# Altium PCB ePBR25_ACU_Controller_rev0.PcbDoc (part 1 of 2)
Units mil, origin at the board's own origin, x right, y up, seen from the top; angles counter-clockwise.
Board outline 3048 x 1903 mil, 2 copper layers (Top Layer, Bottom Layer); 150 components, 106 nets, 515 pads, 139 vias.
Unrouted connection lines stored in the file: 127.
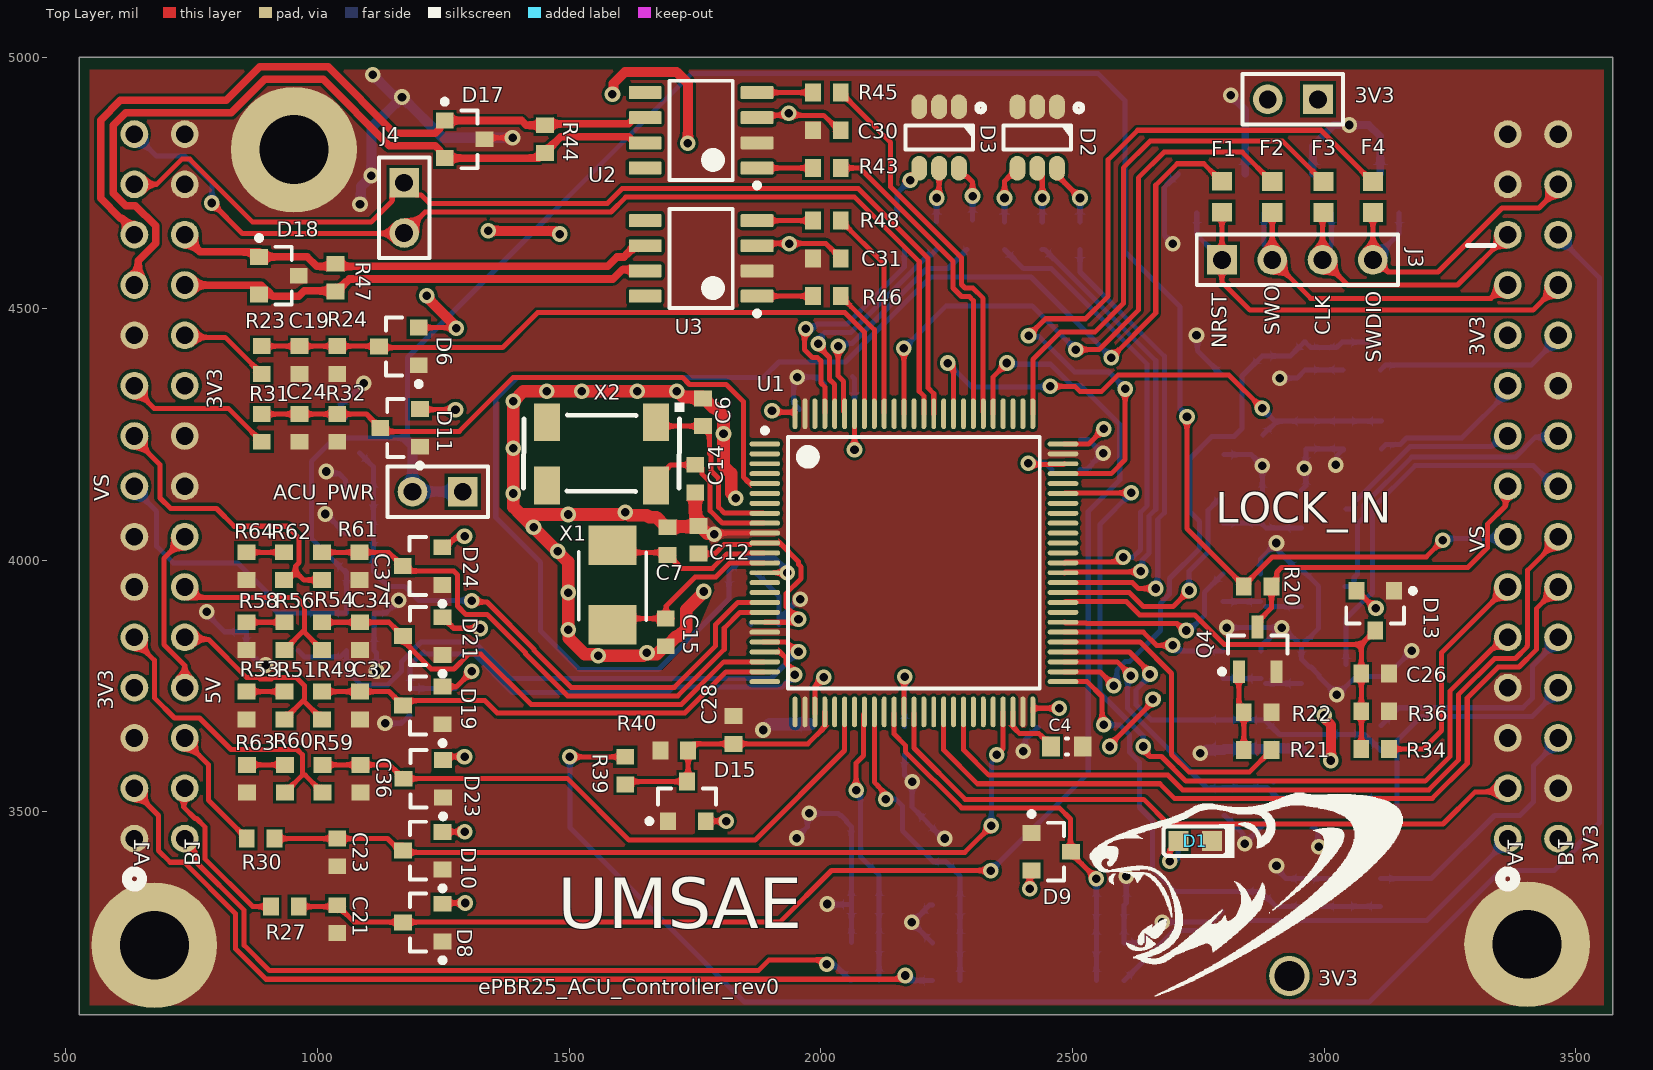
[diagram p0: Top Layer view]
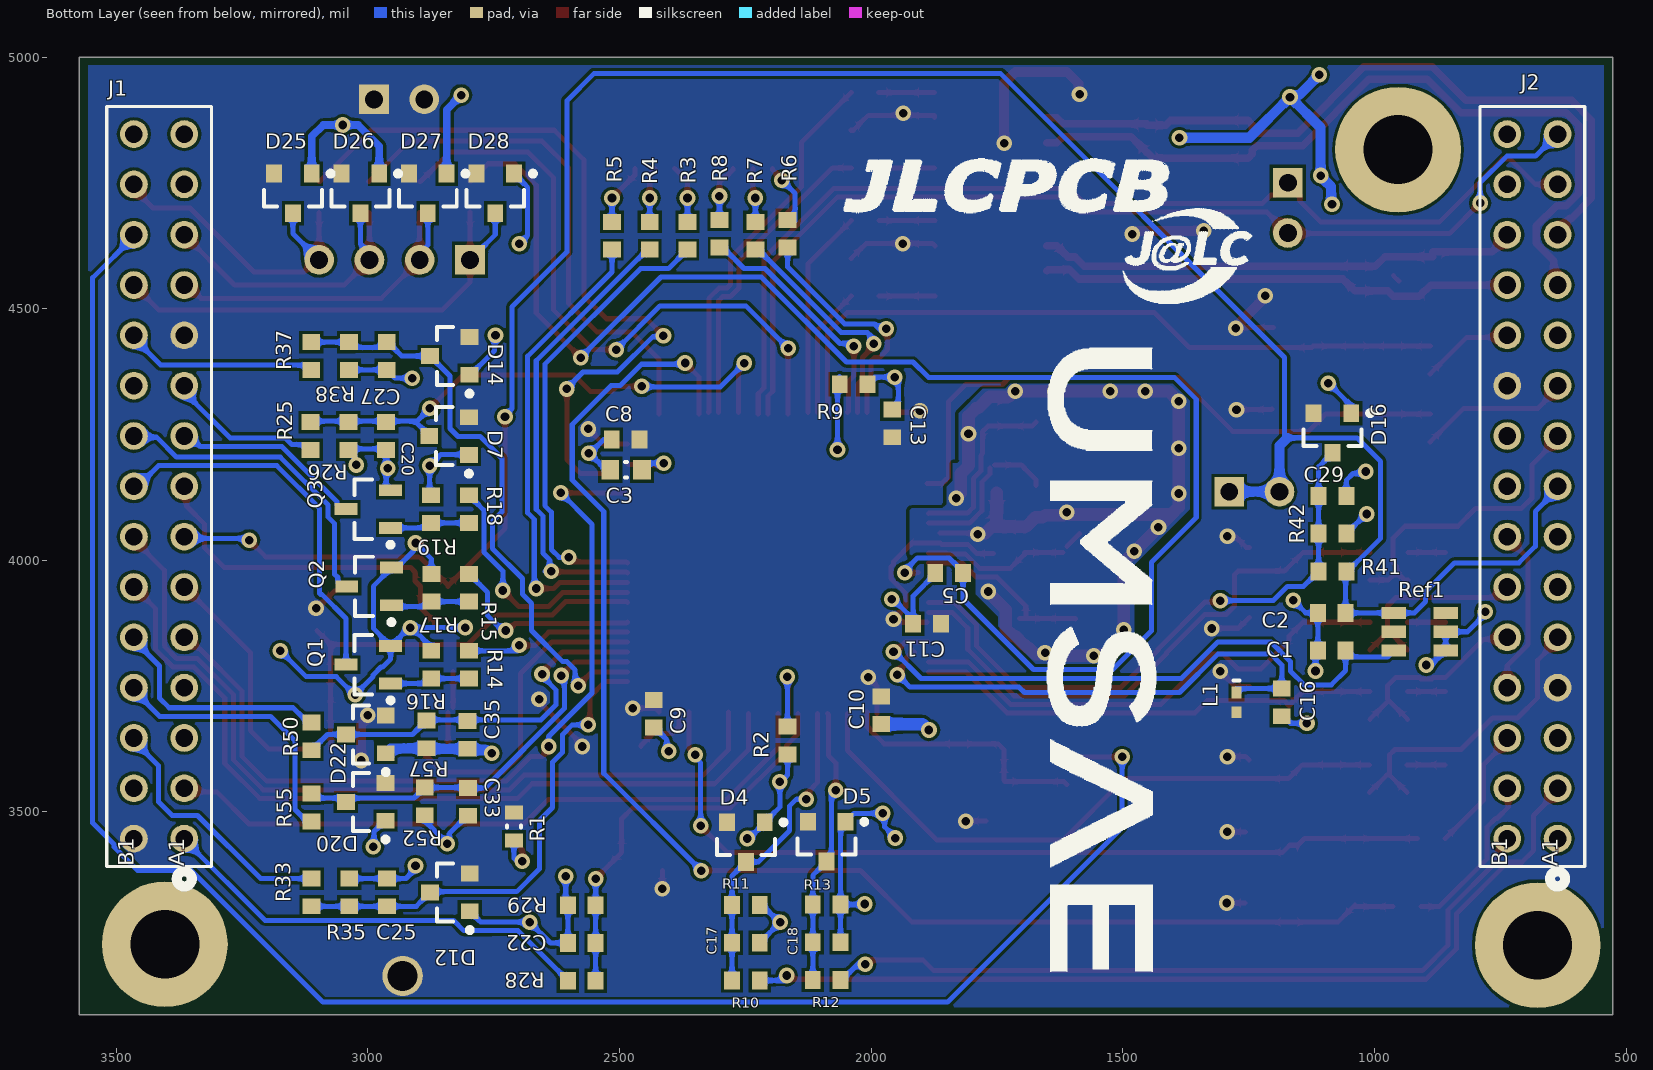
[diagram p1: Bottom Layer view, seen from below]

## Layer stack, top to bottom
Top Solder: solder mask 0.4, Solder Resist, Dk 3.5
Top Layer: signal copper 1.4
Dielectric 1: dielectric 12.6, FR-4, Dk 4.8
Bottom Layer: signal copper 1.4
Bottom Solder: solder mask 0.4, Solder Resist, Dk 3.5

## Board outline
526,3097 3574,3097 3574,5000 526,5000

## Design rules (kind name [scope] priority, off if disabled: settings)
Clearance [All] p1: gap=6 ignorepadtopadclearanceinfootprint=FALSE except(0: Arc-Hole Track-Hole SMDPad-Hole THPad-Hole Via-Hole Fill-Hole Poly-Hole Region-Hole Text-Hole)
DiffPairsRouting [All] p1: maxlimit=10 minlimit=10 mostfreqgap=10 toplayer_minwidth=15 toplayer_maxwidth=15 toplayer_prefwidth=15 bottomlayer_minwidth=15 bottomlayer_maxwidth=15 bottomlayer_prefwidth=15 maxuncoupledlength=500
HoleSize [All] p1: absolutevalues=TRUE maxlimit=200 minlimit=15 maxpercent=80.000 minpercent=20.000
HoleToHoleClearance [All] p1: gap=19.68 allowstackedmicrovias=TRUE
MinimumAnnularRing MinimumAnnularRing_Pad [IsPad] p1: minimumring=7
MinimumAnnularRing MinimumAnnularRing_Via [IsVia] p2: minimumring=5
MinimumSolderMaskSliver [All] p1: minsoldermaskwidth=3.86
PlaneClearance [All] p1: clearance=15
PlaneConnect PlaneConnect_12V [InNet('12V')] p1: planeconnectstyle=Direct reliefexpansion=20 reliefentries=4 reliefconductorwidth=20 reliefairgap=10
PlaneConnect PlaneConnect_1 [All] p2: planeconnectstyle=Relief reliefexpansion=15 reliefentries=4 reliefconductorwidth=15 reliefairgap=10
PolygonConnect [All] p1: connectstyle=Direct reliefconductorwidth=15 reliefentries=4 polygonreliefangle="90 Angle" airgapwidth=10
RoutingVias [All] p1: holewidth=17 width=31 viastyle="Through Hole" minholewidth=15 minwidth=29 maxholewidth=50 maxwidth=100
SilkToSilkClearance [All] p1: silktosilkclearance=1.97
SilkToSolderMaskClearance [IsPad] p1: minsilkscreentomaskgap=5.91 clearancetoexposedcopper=TRUE
SolderMaskExpansion [All] p1: expansion=3 istentingtop=FALSE
SupplyNets "Schematic Supply Nets_4" [InNet('3V3')] p1: voltage=0.000
SupplyNets "Schematic Supply Nets_3" [InNet('GND')] p2: voltage=0.000
SupplyNets "Schematic Supply Nets_2" [InNet('3V3Ref')] p3: voltage=0.000
SupplyNets "Schematic Supply Nets_1" [InNet('ACU_PWR')] p4: voltage=0.000
SupplyNets "Schematic Supply Nets" [InNet('5V')] p5: voltage=0.000
Width [All] p1: maxlimit=200 minlimit=7 preferedwidth=15
22 further rules are at their usual default settings.

## Classes and differential pairs
component class "7  - Microcontroller": 3V3 ACU_PWR D1 J1 J2 J? R1
component class Designator: C19 D6 Q1 Q2 Q3 Q4 R14 R15 R16 R17 R18 R19 R20 R21 R22 R23 R24
differential pair CAN_SENS: +CAN_SENS_P -CAN_SENS_N
differential pair CAN: +CAN_P -CAN_N

## Components (designator, comment, footprint, x,y, rotation, side; value= is the part's Value field where it differs from the comment)
3V3 "" HDR1X2 2988,4916 r180 top (schematic designator J5)
ACU_PWR "" HDR1X2 1288.56,4136.34 r180 top (schematic designator J6)
C1 "Cap" 1608[0603] 1084.83,3820.5 r180 bottom value=1uF
C2 "Cap" 1608[0603] 1084.83,3895.5 r180 bottom value=100nF
C3 "2.2uF" CAPC0603(1608)100_N 2487,4180 r180 bottom value=100nF
C4 "100nF" CAPC0603(1608)100_N 2489,3630 r180 top
C5 "Cap" 1608[0603] 1845,3975 r180 bottom value=100nF
C6 "Cap" 1608[0603] 1766,4294.21 r90 top value=100pF
C7 "Cap" 1608[0603] 1695,4038 r270 top value=100pF
C8 "Cap" 1608[0603] 2488,4240 r180 bottom value=10nF
C9 "Cap" 1608[0603] 2432,3695 r90 bottom value=10nF
C10 "Cap" 1608[0603] 1980,3702 r90 bottom value=10nF
C11 "Cap" 1608[0603] 1889,3874 r180 bottom value=10nF
C12 "Cap" 1608[0603] 1757,4040.74 r270 top value=10nF
C13 "Cap" 1608[0603] 1958,4272 r270 bottom value=10nF
C14 "Cap" 1608[0603] 1750.37,4162.2 r90 top value=100pF
C15 "Cap" 1608[0603] 1691.75,3856.77 r90 top value=100pF
C16 "Cap" 1608[0603] 1184,3717.68 r90 bottom value=100nF
C17 "Cap" 1608[0603] 2249,3240 r0 bottom value=0.47uF
C18 "Cap" 1608[0603] 2088.44,3241 r0 bottom value=0.47uF
C19 "Cap" 1608[0603] 964,4398 r90 top value=100nF
C20 "Cap" 1608[0603] 2963.8,4247 r90 bottom value=0.47uF
C21 "Cap" 1608[0603] 1039,3287 r90 top value=0.47uF
C22 "Cap" 1608[0603] 2575,3239.63 r180 bottom value=0.47uF
C23 "Cap" 1608[0603] 1039,3419.65 r90 top value=0.47uF
C24 "Cap" 1608[0603] 964,4263 r90 top value=0.47uF
C25 "Cap" 1608[0603] 2962,3340 r270 bottom value=100nF
C26 "Cap" 1608[0603] 3101.56,3775 r180 top value=100nF
C27 "Cap" 1608[0603] 2962.59,4406 r90 bottom value=100nF
C28 "Cap" 1608[0603] 1826.38,3662.78 r270 top value=100nF
C29 "Cap" 1608[0603] 1083.29,4128 r0 bottom value=100nF
C30 "Cap" 1608[0603] 2012,4854.56 r0 top value=100nF
C31 "Cap" 1608[0603] 2012,4600 r0 top value=100nF
C32 "Cap" 1608[0603] 1084,3711.56 r90 top value=0.47uF
C33 "Cap" 1608[0603] 2801.06,3520 r90 bottom value=100nF
C34 "Cap" 1608[0603] 1084,3849.33 r90 top value=0.47uF
C35 "Cap" 1608[0603] 2802,3653 r90 bottom value=100nF
C36 "Cap" 1608[0603] 1085,3566 r90 top value=0.47uF
C37 "Cap" 1608[0603] 1083.48,3988.4 r90 top value=0.47uF
D1 "TLSU1008A(T04)" TOSH-0603LED_RED_V 2744,3442 r180 top
D2 "" CLX6C-FKB 2430,4840 r270 top
D3 "" CLX6C-FKB 2235,4840.05 r270 top
D4 "SZNUP1301ML3T1G" ONSC-SOT-23-3-318-08_V 2249,3440 r270 bottom
D5 "SZNUP1301ML3T1G" ONSC-SOT-23-3-318-08_V 2088.44,3441 r270 bottom
D6 "SZNUP1301ML3T1G" ONSC-SOT-23-3-318-08_V 1161.56,4425 r180 top
D7 "SZNUP1301ML3T1G" ONSC-SOT-23-3-318-08_V 2838.8,4247 r0 bottom
D8 "SZNUP1301ML3T1G" ONSC-SOT-23-3-318-08_V 1209,3280 r180 top
D9 "SZNUP1301ML3T1G" ONSC-SOT-23-3-318-08_V 2458,3421 r0 top
D10 "SZNUP1301ML3T1G" ONSC-SOT-23-3-318-08_V 1209,3423 r180 top
D11 "SZNUP1301ML3T1G" ONSC-SOT-23-3-318-08_V 1164,4263 r180 top
D12 "SZNUP1301ML3T1G" ONSC-SOT-23-3-318-08_V 2837,3340 r0 bottom
D13 "SZNUP1301ML3T1G" ONSC-SOT-23-3-318-08_V 3101.56,3900 r270 top
D14 "SZNUP1301ML3T1G" ONSC-SOT-23-3-318-08_V 2837.59,4406 r0 bottom
D15 "SZNUP1301ML3T1G" ONSC-SOT-23-3-318-08_V 1734,3521 r90 top
D16 "SZNUP1301ML3T1G" ONSC-SOT-23-3-318-08_V 1083.29,4253 r270 bottom
D17 "NUP2105LT1" ONSC-SOT-23-3-318-08_V 1292,4836.56 r0 top
D18 "NUP2105LT1" ONSC-SOT-23-3-318-08_V 923,4565.6 r0 top
D19 "SZNUP1301ML3T1G" ONSC-SOT-23-3-318-08_V 1209,3711.56 r180 top
D20 "SZNUP1301ML3T1G" ONSC-SOT-23-3-318-08_V 3004.42,3520 r0 bottom
D21 "SZNUP1301ML3T1G" ONSC-SOT-23-3-318-08_V 1209,3849.33 r180 top
D22 "SZNUP1301ML3T1G" ONSC-SOT-23-3-318-08_V 3004,3654 r0 bottom
D23 "SZNUP1301ML3T1G" ONSC-SOT-23-3-318-08_V 1210,3566 r180 top
D24 "SZNUP1301ML3T1G" ONSC-SOT-23-3-318-08_V 1208.48,3988.4 r180 top
D25 "SZNUP1301ML3T1G" ONSC-SOT-23-3-318-08_V 3149,4729 r270 bottom
D26 "SZNUP1301ML3T1G" ONSC-SOT-23-3-318-08_V 3015,4729 r270 bottom
D27 "SZNUP1301ML3T1G" ONSC-SOT-23-3-318-08_V 2881,4729 r270 bottom
D28 "SZNUP1301ML3T1G" ONSC-SOT-23-3-318-08_V 2747,4729 r270 bottom
F1 "PTC 80 mA" FUSC1608X100N 2797,4722.48 r270 top
F2 "PTC 80 mA" FUSC1608X100N 2897,4722 r270 top
F3 "PTC 80 mA" FUSC1608X100N 2999,4722.13 r270 top
F4 "PTC 80 mA" FUSC1608X100N 3097,4721.87 r270 top
J1 "6-534998-3" 6-534998-5_6-534998-5(Primary) 3465,4147 r90 bottom
J2 "6-534998-3" 6-534998-5_6-534998-5(Primary) 736,4147 r90 bottom
J3 "Header 4" HDR1X4 2797,4597 r0 top
J4 "" HDR1X2 1172,4750.41 r270 top
L1 "Inductor" 0402-A 1274,3717.68 r270 bottom value=10mH
Q1 "" SOT-23_N 2999.29,3792.62 r0 bottom
Q2 "" SOT-23_N 2997.7,3948 r0 bottom
Q3 "" SOT-23_N 2999.48,4101.84 r0 bottom
Q4 "" SOT-23_N 2868,3823 r90 top
R1 "560" RESC0603(1608)_L 2709.82,3471 r270 bottom
R2 "Res1" 1608[0603] 2166,3642 r270 bottom value=10K
R3 "Res1" 1608[0603] 2365,4645 r90 bottom value=130
R4 "Res1" 1608[0603] 2440,4645 r90 bottom value=36
R5 "Res1" 1608[0603] 2515,4645 r90 bottom value=36
R6 "Res1" 1608[0603] 2166,4648.87 r90 bottom value=130
R7 "Res1" 1608[0603] 2230,4645 r90 bottom value=36
R8 "Res1" 1608[0603] 2301.45,4648.87 r90 bottom value=36
R9 "Res1" 1608[0603] 2035,4350 r180 bottom value=10K
R10 "Res1" 1608[0603] 2249,3165 r180 bottom value="1.8k 0.1%"
R11 "Res1" 1608[0603] 2249,3315 r0 bottom value="3.3k 0.1%"
R12 "Res1" 1608[0603] 2088.44,3166 r180 bottom value="1.8k 0.1%"
R13 "Res1" 1608[0603] 2088.44,3316 r0 bottom value="3.3k 0.1%"
R14 "120" 1608[0603] 2799.29,3792.62 r270 bottom value=1K
R15 "120" 1608[0603] 2798.95,3945.47 r270 bottom value=1K
R16 "10K" 1608[0603] 2874.29,3792.62 r270 bottom value=1K
R17 "10K" 1608[0603] 2873.95,3945.47 r270 bottom value=1K
R18 "120" 1608[0603] 2799.48,4101.84 r270 bottom value=1K
R19 "10K" 1608[0603] 2874.48,4101.84 r270 bottom value=1K
R20 "10K" 1608[0603] 2868,3948 r180 top value=1K
R21 "120" 1608[0603] 2868,3623 r180 top value=1K
R22 "10K" 1608[0603] 2868,3698 r180 top value=1K
R23 "Res1" 1608[0603] 889,4398 r90 top value=5K1
R24 "Res1" 1608[0603] 1039,4398 r90 top value=1K5
R25 "Res1" 1608[0603] 3113.8,4247 r270 bottom value="1.8k 0.1%"
R26 "Res1" 1608[0603] 3038.8,4247 r90 bottom value="39k 0.1%"
R27 "Res1" 1608[0603] 935,3311.87 r0 top value=47
R28 "Res1" 1608[0603] 2575,3164.63 r0 bottom value="1.8K 0.1%"
R29 "Res1" 1608[0603] 2575,3314.63 r180 bottom value="3.3K 0.1%"
R30 "Res1" 1608[0603] 886.85,3447 r0 top value=47
R31 "Res1" 1608[0603] 889,4263 r270 top value="1.8K 0.1%"
R32 "Res1" 1608[0603] 1039,4263 r90 top value="3.3K 0.1%"
R33 "Res1" 1608[0603] 3112,3340 r270 bottom value=5K1
R34 "Res1" 1608[0603] 3101.56,3625 r180 top value=5K1
R35 "Res1" 1608[0603] 3037,3340 r270 bottom value=1K5
R36 "Res1" 1608[0603] 3101.56,3700 r180 top value=1K5
R37 "Res1" 1608[0603] 3112.59,4406 r90 bottom value=5K1
R38 "Res1" 1608[0603] 3037.59,4406 r90 bottom value=1K5
R39 "Res1" 1608[0603] 1611.3,3582 r270 top value=5K1
R40 "Res1" 1608[0603] 1708.7,3622.2 r0 top value=1K5
R41 "Res1" 1608[0603] 1083.29,3978 r0 bottom value=5K1
R42 "Res1" 1608[0603] 1083.29,4053 r0 bottom value=1K5
R43 "Res1" 1608[0603] 2012,4779.56 r180 top value=22R
R44 "Res1" 1608[0603] 1452,4837 r270 top value=120R
R45 "Res1" 1608[0603] 2012,4929.56 r180 top value=22R
R46 "Res1" 1608[0603] 2012,4525 r180 top value=22R
R47 "Res1" 1608[0603] 1035.78,4561.67 r270 top value=120R
R48 "Res1" 1608[0603] 2012,4675 r180 top value=22R
R49 "Res1" 1608[0603] 1009,3711.56 r90 top value=47
R50 "Res1" 1608[0603] 3112,3650 r270 bottom value=5K1
R51 "Res1" 1608[0603] 934,3711.56 r270 top value="1.2K 0.1%"
R52 "Res1" 1608[0603] 2887,3521 r90 bottom value=1K5
R53 "Res1" 1608[0603] 859,3711.56 r270 top value="240 0.1%"
R54 "Res1" 1608[0603] 1009,3849.33 r90 top value=47
R55 "Res1" 1608[0603] 3112,3508.72 r90 bottom value=5K1
R56 "Res1" 1608[0603] 934,3849.33 r270 top value="1.2K 0.1%"
R57 "Res1" 1608[0603] 2883.8,3653.95 r90 bottom value=1K5
R58 "Res1" 1608[0603] 859,3849.33 r270 top value="240 0.1%"
R59 "Res1" 1608[0603] 1010,3566 r90 top value=47
R60 "Res1" 1608[0603] 935,3566 r270 top value="1.2K 0.1%"
R61 "Res1" 1608[0603] 1008.48,3988.4 r90 top value=47
R62 "Res1" 1608[0603] 933.48,3988.4 r270 top value="1.2K 0.1%"
R63 "Res1" 1608[0603] 860,3566 r270 top value="240 0.1%"
R64 "Res1" 1608[0603] 858.48,3988.4 r270 top value="240 0.1%"
Ref1 "LT6654AHS6-3.3" TSOT-23 909.83,3858 r90 bottom
U1 "STM32F446VCT6" STM-LQFP100_L 2185,3995 r0 top
U2 "SN65HVD232DR" D0008A_M 1762,4854.56 r180 top
U3 "SN65HVD232DR" D0008A_M 1762,4600 r180 top
X1 "7A-8.000MAAJ-T" "5 x 3.2 mm SMD" 1586,3951 r90 top
X2 "ABS25-32.768KHZ-6-1-T" "SOJ-4, 5.5mm Pitch" 1564,4211.54 r270 top

## Footprints (in the part's own frame and the unit in brackets; to place one, negate y for a bottom-side part, rotate by r counter-clockwise, add the part's x,y. Pads: shape width x height; smd on the part's side, far side on the other; paste and mask are expansions set on the pad)
"5 x 3.2 mm SMD" [mm]
  rect 2x2.4 smd: 1(-2,0) 2(2,0)
  silkscreen extent -1.78,-1.7 1.68,1.7, body extent -2.5,-1.6 2.5,1.6, height 1.2
6-534998-5_6-534998-5(Primary) [mil]
  round 55 hole 35 mask-1000: A1(-700,-100) A2(-600,-100) A3(-500,-100) A4(-400,-100) A5(-300,-100) A6(-200,-100) A7(-100,-100) A8(0,-100) A9(100,-100) A10(200,-100) A11(300,-100) A12(400,-100) A13(500,-100) A14(600,-100) A15(700,-100) B1(-700,0) B2(-600,0) B3(-500,0) B4(-400,0) B5(-300,0) B6(-200,0) B7(-100,0) B8(0,0) B9(100,0) B10(200,0) B11(300,0) B12(400,0) B13(500,0) B14(600,0) B15(700,0)
  silkscreen extent -795,-154 755,54, body extent -750,-150 750,50, height 245
0402-A [mm] "Chip Inductor, Body 1.0x0.5mm, IPC High Density"
  rect 0.6x0.5 smd: 1(-0.5,0) 2(0.5,0)
  silkscreen extent -1.1,-0.15 -1.1,0.15, body extent -0.55,-0.3 0.55,0.3, height 0.55
1608[0603] [mm] "Chip Capacitor, Body 1.6x0.8mm, IPC High Density"
  rect 0.8x0.9 smd: 1(-0.7,0) 2(0.7,0)
  body extent -0.87,-0.48 0.87,0.48, height 1.3
CAPC0603(1608)100_N [mm] "Chip Capacitor, Body 1.6x0.8mm, Height 1.0mm, IPC Medium Density"
  rect 0.9x1 smd: 1(-0.8,0) 2(0.8,0)
  silkscreen extent -0.05,-0.4 0.05,0.4, body extent -0.87,-0.48 0.88,0.47, height 1
CLX6C-FKB [mm]
  oval 1.25x0.8 smd: 1(-1.55,1) 2(-1.55,0) 3(-1.55,-1) 4(1.55,-1) 5(1.55,0) 6(1.55,1)
  silkscreen extent -1.72,-1.7 0.6,2.32, body extent -1.7,-1.7 1.7,1.7, height 2.8
D0008A_M [mm] "SOIC, 8-Leads, Body 5x4mm, Pitch 1.27mm, IPC Low Density"
  rrect15% 1.65x0.65 smd: 1(-2.825,1.905) 2(-2.825,0.635) 3(-2.825,-0.635) 4(-2.825,-1.905) 5(2.825,-1.905) 6(2.825,-0.635) 7(2.825,0.635) 8(2.825,1.905)
  silkscreen extent -2.95,-2.5 1.6,2.9, body extent -3,-2.45 3,2.45, height 1.63
FUSC1608X100N [mm]
  rect 0.95x1.02 smd: 1(-0.784,0) 2(0.784,0)
HDR1X2 [mm] "Connector; Header; 2 Position"
  rect 1.5x1.5 hole 0.9: 1(0,0)
  round 1.5 hole 0.9: 2(2.54,0)
  silkscreen extent -1.27,-1.27 3.81,1.27
HDR1X4 [mm] "Connector; Header; 4 Position"
  rect 1.5x1.5 hole 0.9: 1(0,0)
  round 1.5 hole 0.9: 2(2.54,0) 3(5.08,0) 4(7.62,0)
  silkscreen extent -1.27,-1.27 8.89,1.27
ONSC-SOT-23-3-318-08_V [mm] "SOT23, 3-Leads, Body 2.92x1.3mm, Pitch 0.95mm"
  rect 0.9x0.8 smd: 1(-1,0.95) 2(-1,-0.95) 3(1,0)
  silkscreen extent -1.12,-1.46 0.65,2.02, body extent -0.65,-1.46 0.65,1.46, height 1.11
RESC0603(1608)_L [mm]
  rect 0.7x0.9 smd: 1(-0.7,0) 2(0.7,0)
  silkscreen extent -0.05,-0.35 0.05,0.35, body extent -0.85,-0.47 0.85,0.47, height 0.6
"SOJ-4, 5.5mm Pitch" [mm]
  rect 1.9x1.3 smd: 1(-1.6,2.75) 2(-1.6,-2.75) 3(1.6,-2.75) 4(1.6,2.75)
  silkscreen extent -2.6,-3.93 1.9,4.2, body extent -1.9,-4 1.9,4, height 2.5
SOT-23_N [mm] "SOT23, 3-Leads, Body 2.9x1.3mm, Pitch 0.95mm, Lead Span 2.5mm, IPC Medium Density"
  rect 1.15x0.6 smd: 1(-1.125,0.95) 2(-1.125,-0.95) 3(1.125,0)
  silkscreen extent -1.25,-1.5 0.7,1.92, body extent -0.7,-1.5 0.7,1.5, height 1.1
STM-LQFP100_L [mm] "Thin QFP, 100-Leads, Body 14x14mm, Pitch 0.5mm, IPC High Density"
  oval 1.55x0.25 smd: 1(-7.525,6) 2(-7.525,5.5) 3(-7.525,5) 4(-7.525,4.5) 5(-7.525,4) 6(-7.525,3.5) 7(-7.525,3) 8(-7.525,2.5) 9(-7.525,2) 10(-7.525,1.5) 11(-7.525,1) 12(-7.525,0.5) 13(-7.525,0) 14(-7.525,-0.5) 15(-7.525,-1) 16(-7.525,-1.5) 17(-7.525,-2) 18(-7.525,-2.5) 19(-7.525,-3) 20(-7.525,-3.5) 21(-7.525,-4) 22(-7.525,-4.5) 23(-7.525,-5) 24(-7.525,-5.5) 25(-7.525,-6) 51(7.525,-6) 52(7.525,-5.5) 53(7.525,-5) 54(7.525,-4.5) 55(7.525,-4) 56(7.525,-3.5) 57(7.525,-3) 58(7.525,-2.5) 59(7.525,-2) 60(7.525,-1.5) 61(7.525,-1) 62(7.525,-0.5) 63(7.525,0) 64(7.525,0.5) 65(7.525,1) 66(7.525,1.5) 67(7.525,2) 68(7.525,2.5) 69(7.525,3) 70(7.525,3.5) 71(7.525,4) 72(7.525,4.5) 73(7.525,5) 74(7.525,5.5) 75(7.525,6)
  oval 0.25x1.55 smd: 26(-6,-7.525) 27(-5.5,-7.525) 28(-5,-7.525) 29(-4.5,-7.525) 30(-4,-7.525) 31(-3.5,-7.525) 32(-3,-7.525) 33(-2.5,-7.525) 34(-2,-7.525) 35(-1.5,-7.525) 36(-1,-7.525) 37(-0.5,-7.525) 38(0,-7.525) 39(0.5,-7.525) 40(1,-7.525) 41(1.5,-7.525) 42(2,-7.525) 43(2.5,-7.525) 44(3,-7.525) 45(3.5,-7.525) 46(4,-7.525) 47(4.5,-7.525) 48(5,-7.525) 49(5.5,-7.525) 50(6,-7.525) 76(6,7.525) 77(5.5,7.525) 78(5,7.525) 79(4.5,7.525) 80(4,7.525) 81(3.5,7.525) 82(3,7.525) 83(2.5,7.525) 84(2,7.525) 85(1.5,7.525) 86(1,7.525) 87(0.5,7.525) 88(0,7.525) 89(-0.5,7.525) 90(-1,7.525) 91(-1.5,7.525) 92(-2,7.525) 93(-2.5,7.525) 94(-3,7.525) 95(-3.5,7.525) 96(-4,7.525) 97(-4.5,7.525) 98(-5,7.525) 99(-5.5,7.525) 100(-6,7.525)
  silkscreen extent -7.65,-6.35 6.35,6.8, body extent -7,-7 7,7, height 1.6
TOSH-0603LED_RED_V [mm] "SMT LED, 2-Leads, Body 1.6x0.8mm (0603-Size)"
  rect 1x1 smd paste+0 mask+0: 1(0.85,0) 2(-0.85,0)
  silkscreen extent -1.97,-0.85 1.6,0.85, body extent -0.92,-0.53 1.09,0.53, height 0.6
TSOT-23 [mm]
  rect 0.62x1.22 smd: 1(-0.95,-1.31) 2(0,-1.31) 3(0.95,-1.31) 4(0.95,1.31) 5(0,1.31) 6(-0.95,1.31)
  body extent -1.45,-0.85 1.45,0.85, height 1

## Part data
3V3 ACU_PWR J4: library part "Header 2", "Header, 2-Pin", LatestRevisionDate=17-Jul-2002, LatestRevisionNote="Re-released for DXP Platform.", Publisher="Altium Limited"
C1 C2 C5 C6 C7 C8 C9 C10 C11 C12 C13 C14 C15 C16 C17 C18 C19 C20 C21 C22 C23 C24 C25 C26 C27 C28 C29 C30 C31 C32 C33 C34 C35 C36 C37: "Capacitor", LatestRevisionDate=17-Jul-2002, LatestRevisionNote="Re-released for DXP Platform.", PackageDescription="Radial Cap, Thru-Hole; 2 Leads; 0.3 in Pin Spacing", PackageReference=RAD-0.3, Published=8-Jun-2000, Publisher="Altium Limited"
C3 C4: library part CMP-1035-02582-1, "CAP 100nF 10V -20% to +80% 0603 (1608 Metric) Thickness 1mm SMD", Case-EIA=0603, Case-Metric=1608, Rated Voltage="10 V", Tolerance="-20% to +80%", Max Thickness="1 mm", Technology=SMT
D1: library part CMP-0444-00001-1, "LED, Red 0603 (1608) 63mCd", Forward Current="25 mA", Manufacturer=Toshiba, Power Dissipation="60 mW", Reverse Voltage="4 V", Storage Temperature="-40 to 100 degC", ComponentLink1Description="Manufacturer URL", ComponentLink1URL=http://www.toshiba-components.com/, ComponentLink2Description=Datasheet, ComponentLink2URL=http://www.semicon.toshiba.co.jp/info/docget.jsp?type=datasheet&lang=en&pid=TLSU1008A(T04), DatasheetVersion=Aug-08, Mounting Technology="Surface Mount", PackageDescription="2-Pin SMT LED, 1.6 x 0.8 mm Pitch", PackageReference=0603LED_RED, Packing Type=Reel, PartNumber=TLSU1008A(T04)
D2 D3: library part "LED - CLX6C-FKB-CGJKNCFBB789363 RGB", Color="Red, Green, Blue (RGB)", Current - Test="8mA Red, 8mA Green, 8mA Blue", Lens Color=White, Manufacturer="Cree Inc.", Manufacturer Part Number=CLX6C-FKB-CGJKNCFBB789363, Millicandela Rating="420mcd Red, 840mcd Green, 196mcd Blue", Package / Case="6-SMD, J-Lead", Supplier Device Package=6-PLCC, Supplier Part Number 1=475-2899-1-ND, Voltage - Forward (Vf) (Typ)="1.9V Red, 3V Green, 3V Blue", Category=Optoelectronics, ComponentLink1Description=http://www.cree.com/~/media/Files/Cree/LED-Components-and-Modules/HB/Data-Sheets/1281-CLX6C-FKB.pdf, ComponentLink1URL=http://www.cree.com/~/media/Files/Cree/LED-Components-and-Modules/HB/Data-Sheets/1281-CLX6C-FKB.pdf, Features=-, Height (Max)=2.90mm, Lens Style/Size="Square with Flat Top, 1.00mm", Lens Transparency=Diffused, Mounting Type="Surface Mount", Packaging="Cut Tape (CT)", Part Status=Active, RoHS="RoHS Compliant", Size / Dimension="3.40mm L x 3.40mm W", Supplier 1=Digi-Key, Viewing Angle=-, Wavelength - Dominant="622nm Red, 531nm Green, 470nm Blue", Wavelength - Peak=-
D4 D5 D6 D7 D8 D9 D10 D11 D12 D13 D14 D15 D16 D19 D20 D21 D22 D23 D24: library part CMP-1063-00171-1, "Low Capacitance Diode Array for ESD Protection in a Single Data Line, 3-Pin SOT-23, Pb-Free, Tape and Reel", Manufacturer="On Semiconductor", C Max (pF)=0.9, ComponentLink1Description="Manufacturer URL", ComponentLink1URL=http://www.onsemi.com/, ComponentLink2Description=Datasheet, ComponentLink2URL=http://www.onsemi.cn/pub_link/Collateral/NUP1301ML3T1-D.PDF, ComponentLink3Description="Package Specification", ComponentLink3URL=http://www.onsemi.cn/pub_link/Collateral/318-08.PDF, DatasheetVersion="Rev. 6", Direction=Bidirectional, Mounting Technology="Surface Mount", Number of Lines=1, PackageDescription="3-Pin Small Outline Transistor, Body 2.92 x 1.3 mm, Pitch 0.95 mm", PackageReference=SOT-23-3-318-08, PackageVersion="Rev. AP, 11/2009", Packing="Tape and Reel", PartNumber=SZNUP1301ML3T1G, RoHS=Pb-Free, V(BR) Min (V)=70, VRWM Max (V)=70
D17 D18: library part CMP-1063-00165-1, "Dual Line CAN Bus Protector, 3-Pin SOT-23, Tape and Reel", Manufacturer="On Semiconductor", C Max (pF)=30, ComponentLink1Description="Manufacturer URL", ComponentLink1URL=http://www.onsemi.com/, ComponentLink2Description=Datasheet, ComponentLink2URL=http://www.onsemi.cn/pub_link/Collateral/NUP2105L-D.PDF, ComponentLink3Description="Package Specification", ComponentLink3URL=http://www.onsemi.cn/pub_link/Collateral/318-08.PDF, DatasheetVersion="Rev. 5", Direction=Bidirectional, IR Max (uA)=0.1, Mounting Technology="Surface Mount", Number of Lines=2, PackageDescription="3-Pin Small Outline Transistor, Body 2.92 x 1.3 mm, Pitch 0.95 mm", PackageReference=SOT-23-3-318-08, PackageVersion="Rev. AP, 11/2009", Packing="Tape and Reel", PartNumber=NUP2105LT1, PPK Max (W)=350, V(BR) Min (V)=26.2
D25 D26 D27 D28: library part CMP-1063-00171-1, "Low Capacitance Diode Array for ESD Protection in a Single Data Line, 3-Pin SOT-23, Pb-Free, Tape and Reel", Manufacturer="On Semiconductor", Supplier Part Number 1=863-SZNUP1301ML3T1G, C Max (pF)=0.9, ComponentLink1Description="Manufacturer URL", ComponentLink1URL=http://www.onsemi.com/, ComponentLink2Description=Datasheet, ComponentLink2URL=http://www.onsemi.cn/pub_link/Collateral/NUP1301ML3T1-D.PDF, ComponentLink3Description="Package Specification", ComponentLink3URL=http://www.onsemi.cn/pub_link/Collateral/318-08.PDF, DatasheetVersion="Rev. 6", Direction=Bidirectional, Mounting Technology="Surface Mount", Number of Lines=1, PackageDescription="3-Pin Small Outline Transistor, Body 2.92 x 1.3 mm, Pitch 0.95 mm", PackageReference=SOT-23-3-318-08, PackageVersion="Rev. AP, 11/2009", Packing="Tape and Reel", PartNumber=SZNUP1301ML3T1G, RoHS=Pb-Free, Supplier 1=Mouser, V(BR) Min (V)=70, VRWM Max (V)=70
F1 F2 F3 F4: library part "PTC fuse 80mA 0ZCM0008FF2G", "0ZCM0008FF2G", Supplier Part Number 1=507-1817-1-ND, Supplier 1=Digi-Key
J1 J2: Supplier Part Number 1=S7118-ND, Built_By=EMA_UL_Team, C="Copyright (C) 2015 Accelerated Designs. All rights reserved", Manufacturer_Part_Number=6-534998-3, Supplier 1=Digi-Key, Vendor="TE Connectivity"
J3: "Header, 4-Pin", LatestRevisionDate=17-Jul-2002, LatestRevisionNote="Re-released for DXP Platform.", Publisher="Altium Limited"
Q1 Q2 Q3 Q4: library part MOSFET-N, "N-Channel MOSFET", Current - Continuous Drain (Id) @ 25°C="50A (Tc)", Drain to Source Voltage (Vdss)=30V, Input Capacitance (Ciss) @ Vds="1900pF @ 15V", Manufacturer="Infineon Technologies", Manufacturer Part Number="IPD075N03L G", Package / Case="TO-252-3, DPak (2 Leads + Tab), SC-63", Power - Max=47W, Supplier Device Package=PG-TO252-3, Supplier Part Number 1=DMG3406L-13DICT-ND, Category="Discrete Semiconductor Products", ComponentLink1Description=http://www.infineon.com/dgdl/Infineon-IPD075N03LG-DS-v02_01-en.pdf?folderId=5546d4694909da4801490a07012f053b&fileId=db3a30431936bc4b011951d824f83aeb, ComponentLink1URL=http://www.infineon.com/dgdl/Infineon-IPD075N03LG-DS-v02_01-en.pdf?folderId=5546d4694909da4801490a07012f053b&fileId=db3a30431936bc4b011951d824f83aeb, ComponentLink2Description=http://www.semicon.toshiba.co.jp/info/docget.jsp?type=datasheet&lang=en&pid=SSM3K329R, ComponentLink2URL=http://www.semicon.toshiba.co.jp/info/docget.jsp?type=datasheet&lang=en&pid=SSM3K329R, FET Feature="Logic Level Gate", FET Type="MOSFET N-Channel, Metal Oxide", Gate Charge (Qg) @ Vgs="18nC @ 10V", LatestRevisionDate=17-Jul-2002, LatestRevisionNote="Re-released for DXP Platform.", Mounting Type="Surface Mount", PackageDescription="TO, Flat Index; 3 In-Line, Axial Leads; Body Dia. 4.6mm; Lead Dia. 0.5 mm (max)", PackageReference=E3, PackageVersion=1995/1996, Packaging="Cut Tape (CT)", Published=8-Jun-2000, Publisher="Altium Limited", Rds On (Max) @ Id, Vgs="7.5 mOhm @ 30A, 10V", RoHS="RoHS Compliant", Supplier 1=Digi-Key, Vgs(th) (Max) @ Id="2.2V @ 250µA"
R1: library part CMP-1591-00001-1, "0603 (1608 Metric) Chip Resistor", Case-EIA=0603, Case-Metric=1608, PackageReference=RESC0603(1608)
R2 R3 R4 R5 R6 R7 R8 R9 R10 R11 R12 R13 R23 R24 R25 R26 R27 R28 R29 R30 R31 R32 R33 R34 R35 R36 R37 R38 R39 R40 R41 R42 R43 R44 R45 R46 R47 R48 R49 R50 R51 R52 R53 R54 R55 R56 R57 R58 R59 R60 R61 R62 R63 R64: "Resistor", LatestRevisionDate=17-Jul-2002, LatestRevisionNote="Re-released for DXP Platform.", PackageDescription="Axial Device, Thru-Hole; 2 Leads; 0.3 in Pin Spacing", PackageReference=AXIAL-0.3, Published=8-Jun-2000, Publisher="Altium Limited"
R14 R15 R16 R17 R18 R19 R20 R21 R22: library part Res1, "Resistor", LatestRevisionDate=17-Jul-2002, LatestRevisionNote="Re-released for DXP Platform.", PackageDescription="Axial Device, Thru-Hole; 2 Leads; 0.3 in Pin Spacing", PackageReference=AXIAL-0.3, Published=8-Jun-2000, Publisher="Altium Limited"
Ref1: "TSOT-23-56", Current - Cathode=-, Current - Output=10mA, Current - Supply=600µA, Digikey Part Number=LT6654AHS6-3.3#TRMPBFCT-ND, Manufacturer="Linear Technology", Operating Temperature="-40°C ~ 125°C (TA)", Package / Case="SOT-23-6 Thin, TSOT-23-6", Supplier Device Package=TSOT-23-6, Temperature Coefficient=10ppm/°C, Tolerance=±0.05%, Voltage - Input="3.8 V ~ 36 V", Voltage - Output (Min/Fixed)=3.3V, Category="Integrated Circuits (ICs)", ComponentLink1Description=http://www.linear.com/docs/29677, ComponentLink1URL=http://www.linear.com/docs/29677, Digikey Link=http://www.digikey.com/product-detail/en/linear-technology/LT6654AHS6-3.3-TRMPBF/LT6654AHS6-3.3-TRMPBFCT-ND/2485839, Manufacturer Part Number=LT6654AHS6-3.3, Mounting Type="Surface Mount", Noise - 0.1Hz to 10Hz=1.7ppmp-p, Noise - 10Hz to 10kHz=2ppmrms, Output Type=Fixed, Packaging="Cut Tape (CT)", Part Status=Active, Pricing 1="1=9.53, 25=8.508, 100=5.5596, 250=5.1048 (CAD)", Reference Type=Series, RoHS="RoHS Compliant", Stock 1=1315, Supplier 1=Digi-Key, Supplier Part Number 1=LT6654AHS6-3.3#TRMPBFCT-ND, Voltage - Output (Max)=-
U1: library part CMP-0243-00219-1, "ARM Cortex-M4 32-bit MCU+FPU, 256 KB Flash, 128 KB Internal RAM, 81 I/Os, 100-Pin LQFP, -40 to 85 degC, Tray", I/Os (High Current)=81, Operating Frequency(F) (Processor speed) (MHz)=180, Package Description=LQFP100, Package Reference="100-Pin Low Profile Quad Flat Package, Body 14 x 14 mm, Pitch 0.5 mm", Supply Voltage(Vcc) min (V)=1.7, ComponentLink1Description="Manufacturer URL", ComponentLink1URL=http://www.st.com/, ComponentLink2Description=Datasheet, ComponentLink2URL=http://www.st.com/st-web-ui/static/active/en/resource/technical/document/datasheet/DM00141306.pdf, Core="ARM Cortex-M4", D/A Converter=2, DatasheetVersion="Rev. 6", FLASH Size (Prog) (kB)=256, Internal RAM Size (kB)=128, Mounting Technology="Surface Mount", Packing=Tray
U2 U3: library part CMP-0315-00075-2, "3.3 V Can Transceiver, 17 mA, -40 to 85 degC, 8-pin SOIC (D), Green (RoHS & no Sb/Br)", Drivers Per Package=1, Manufacturer="Texas Instruments", Rating=Catalog, Supply Voltage(s)(V)=3.3, Code_JEDEC=MS-012AA, ComponentLink1Description=Datasheet, ComponentLink1URL=http://www.ti.com/general/docs/lit/getliterature.tsp?genericPartNumber=SN65HVD232&fileType=pdf, DatasheetVersion=SLOS346K, Eco-Plan="Green (RoHS & no Sb/Br)", ICC(Max)(mA)=17, Isolated=No, Mounting Technology="Surface Mount", PackageDescription="8-Pin Plastic Small Outline Integrated Circuit, 4.9 x 3.9 mm, Pitch 1.27 mm Pitch", PackageReference=D0008A, PackageVersion="revM, Jun-2011", PartNumber=SN65HVD232DR, Receivers Per Package=1, SubFamily=CAN, Transient Pulse Protection(V)="-25 to 25"
X1: library part "8MHz crystal, 7A-8.000MAAJ-T", ESR (Equivalent Series Resistance)="80 Ohm", Frequency=8MHz, Frequency Stability=±30ppm, Load Capacitance=18pF, Manufacturer="TXC CORPORATION", Operating Mode=Fundamental, Operating Temperature="-20°C ~ 70°C", Package / Case="2-SMD, No Lead", Ratings=-, Supplier Part Number 1=887-1448-1-ND, Category="Crystals, Oscillators, Resonators", ComponentLink1Description=http://www.txccrystal.com/images/pdf/7a.pdf, ComponentLink1URL=http://www.txccrystal.com/images/pdf/7a.pdf, Frequency Tolerance=±30ppm, Height - Seated (Max)="0.053\" (1.35mm)", Manufacturer Part Number=7A-8.000MAAJ-T, Mounting Type="Surface Mount", Packaging="Cut Tape (CT)", Part Status=Active, Pricing 1="1=1.12, 10=0.989, 50=0.9234, 100=0.8162, 500=0.77322 (CAD)", RoHS="RoHS Compliant", Size / Dimension="0.197\" L x 0.126\" W (5.00mm x 3.20mm)", Stock 1=30692, Supplier 1=Digi-Key, Type="MHz Crystal"
X2: Digikey Part Number=535-10241-1-ND, ESR (Equivalent Series Resistance)="50 kOhm", Frequency=32.768kHz, Frequency Stability=-, Frequency Tolerance=±10ppm, Load Capacitance=6pF, Manufacturer="Abracon LLC", Operating Mode=Fundamental, Operating Temperature="-40°C ~ 85°C", Package / Case="4-SOJ, 5.50mm pitch", Category="Crystals, Oscillators, Resonators", ComponentLink1Description=http://www.abracon.com/Resonators/abs25.pdf, ComponentLink1URL=http://www.abracon.com/Resonators/abs25.pdf, Digikey Link=http://www.digikey.ca/product-detail/en/abracon-llc/ABS25-32.768KHZ-6-1-T/535-10241-1-ND/2218054, Height - Seated (Max)="0.098\" (2.50mm)", Manufacturer Part Number=ABS25-32.768KHZ-6-1-T, Mounting Type="Surface Mount", Packaging="Cut Tape (CT)", Part Status=Active, Pricing 1="1=1, 10=0.837, 50=0.7538, 100=0.6701, 500=0.63664, 1000=0.5361 (CAD)", Ratings=-, RoHS="RoHS Compliant", Size / Dimension="0.315\" L x 0.150\" W (8.00mm x 3.80mm)", Stock 1=47244, Supplier 1=Digi-Key, Supplier Part Number 1=535-10241-1-ND, Type="kHz Crystal (Tuning Fork)"
L1: Code_IEC=1005, Code_JEITA=0402, LatestRevisionDate=29-May-2009, LatestRevisionNote="IPC-7351 Footprint Added.", PackageDescription="Chip Inductor", PackageReference=0402-A, Published=8-Jun-2000, Publisher="Altium Limited"

## Free pads (board coordinates)
  round 250 hole 137: 9(675.5,3235.08) 9(953,4816) 9(3403.48,3237)
  round 80 hole 60: 9(2931,3174)

## Via types
v1: diameter 31, hole 17, Top Layer to Bottom Layer, 139 vias

## Nets (pads, with @x,y where several pads share a name; then routed paths per layer and width w, separated by ;. In a path a pad name is that pad's centre, name@x,y a point inside that pad or via, vN(x,y) a via of type N, cw(c..) or ccw(c..) an arc to the next point about the centre after c; other vN are vias at no path point)
3V3: 3V3.1 3V3.2 C8.2 C9.2 C10.2 C11.2 C12.2 C13.2 C30.2 C31.2 D4.2 D5.2 D6.2 D7.2 D8.2 D9.2 D10.2 D11.2 D12.2 D13.2 D14.2 D15.2 D16.2 D19.2 D20.2 D21.2 D22.2 D23.2 D24.2 D25.2 D26.2 D27.2 D28.2 J1.A11 J1.B1 J2.A4 J2.B10 L1.2 pad.9@2931,3174 R1.1 U1.11 U1.19 U1.28 U1.50 U1.75 U1.100 U2.3 U3.3 | length 2452.1
  Top Layer w10: D6.2@1200.93,4462.4 1274,4462.4 v1(1275.45,4460.95) v1@1275.45,4464.19 ; D11.2@1203.37,4300.4 1204.21,4299.56 v1(1274,4299.56) ; v1@1216.89,4522.75 v1(1216.89,4525.99) ; D24.2@1247.85,4025.8 1254.8,4025.8 1284.5,4055.5 v1(1292,4048) ; D19.2@1248.37,3748.96 1275.96,3748.96 v1(1306.34,3779.34) ; D21.2@1248.37,3886.73 1270.1,3865 1322.5,3865 v1(1323,3864.5) ; D23.2@1249.37,3603.4 1255.97,3610 v1(1292,3610) ; D10.2@1255.98,3460.4 v1(1292.02,3460.4) ; D8.2@1257.22,3319.03 v1(1293.25,3319.03) ; v1@1475.81,4648.33 v1(1481.49,4648.33) ; v1(1585.93,4926.21) v1@1587.97,4928.25 ; C12.2@1757,4013.18 1789.48,4013.18 1807.99,4031.68 1860.62,4031.68 1863.31,4034.37 U1.11@1888.74,4034.37 1888.82,4034.29 1918.65,4034.29 1955.6,3997.34 1955.6,3992.02 1960.92,3986.71 1960.92,3963.92 1931.25,3934.26 1931.25,3907.61 v1(1955.6,3883.26) 1949.92,3883.26 1943.55,3876.89 U1.19@1888.74,3876.89 ; D15.2@1771.4,3481.63 v1(1812.07,3481.63) ; U3.3@1873.22,4625 1877.94,4629.72 2009.84,4629.72 C31.2@2039.56,4600 ; U2.3@1873.78,4879.56 1873.78,4884.28 2005.72,4884.28 2035.44,4854.56 C30.2@2040.12,4854.56 ; v1(1903,4297.4) 1906.19,4294.21 U1.100@1948.78,4294.21 ; U1.28@1988.15,3695.79 1988.15,3750 v1(2006,3767.85) ; v1(2415.1,3347.35) D9.2@2415.1,3383.38 ; U1.50@2421.22,3698.74 2421.22,3705.92 2421.3,3706 v1(2474,3706) ; U1.75@2484.21,4231.22 2532.22,4231.22 v1(2562,4261) v1@2559,4261 ; v1@2578,3637 v1@2670.5,3729.5 ; v1@3000.58,3686.11 v1(3000.58,3691.79) ; D13.2@3064.16,3939.37 3066.19,3939.37 v1@3101.56,3904
  Top Layer w20: v1@1216.89,4522.75 v1@1275.45,4464.19 ; v1(1339.22,4654.72) 1472.13,4654.72 1476.41,4650.44 v1@1476.41,4648.33 ; v1@1587.97,4928.25 1587.97,4947.31 1611.05,4970.38 1713.57,4970.38 1735.69,4948.27 v1(1735.69,4829.1) ; v1@3000.58,3686.11 3013.6,3673.08 v1(3013.6,3602.16)
  Bottom Layer w10: C11.2@1861.44,3872.03 C11.2@1861.44,3874
  other v1: 2574,3630 2660,3724 3103.12,3905 1937.56,4629 1936.56,4888
3V3Ref: C1.2 Ref1.6 U1.21 | length 1232.2
  Top Layer w10: U1.21@1885.79,3837.52 1931.94,3837.52 1951.45,3818.01 v1(1955.56,3818.01)
  Bottom Layer w10: Ref1.6@961.4,3820.6 974,3808 1044.77,3808 C1.2@1057.27,3820.5 1057.27,3780.73 1085.5,3752.5 1139.5,3752.5 1167,3780 1167,3799.04 1205.46,3837.5 1311.11,3837.5 1383.61,3765 1901.11,3765 1954.12,3818.01 v1(1955.56,3818.01)
5V: J2.B4 J2.B7 | length 331.5
  Top Layer w10: J2.B7@733.98,4043 694.48,4003.5 694.48,3832.65 736,3791.14 J2.B4@736,3745.02
ACU_PWR: ACU_PWR.1 ACU_PWR.2 C2.2 J1.A7 J2.A8 R20.2 R41.1 Ref1.4 | length 4800.7
  Top Layer w10: v1(2727.59,4285.5) 2727.59,4062.82 R20.2@2840.44,3949.97 ; R20.2@2840.44,3948 R20.2@2840.44,3949.97 ; v1(3236.21,4040) 3203.08,4006.87 2897.34,4006.87 R20.2@2840.44,3949.97
  Bottom Layer w10: J2.A8@633.98,4143 680.14,4096.85 680.14,4027.86 713,3995 841,3995 898,3938 898,3918 920.6,3895.4 Ref1.4@961.4,3895.4 1057.17,3895.4 C2.2@1057.27,3895.5 1057.27,3976.46 R41.1@1055.73,3978 R41.1@1055.73,3979.97 ; R41.1@1055.96,3975.15 987.5,4043.61 987.5,4196.39 1034.46,4243.35 1172.9,4243.35 1178.76,4249.2 1178.76,4403.15 1742.61,4967 2551,4967 2604.56,4913.44 2604.56,4612.94 2713.75,4503.75 2713.75,4301.86 2727.59,4288.03 v1(2727.59,4285.5) ; v1(3236.21,4040) 3239.71,4043.5 3362.98,4043.5 J1.A7@3363.98,4044.51
  Bottom Layer w20: 1172.9,4243.35 1188.56,4227.69 ACU_PWR.2@1188.56,4136.34 ACU_PWR.1@1288.56,4136.34
AIR+_CTRL: J1.B9 Q2.3 | length 626.2
  Bottom Layer w10: Q2.3@3041.99,3948 3052.82,3948 3059.63,3954.81 3059.63,3965.64 3066.19,3972.2 3066.19,4072.84 3079,4085.65 3079,4109.96 3174.05,4205.01 3380.35,4205.01 3419.85,4244.51 3459.48,4244.51 J1.B9@3463.98,4240
AIR+_CTRL_µC: R15.1 U1.57 | length 406.5
  Top Layer w10: U1.57@2484.21,3876.89 2485.99,3875.11 2527.06,3875.11 2527.97,3874.2 2708.02,3874.2 2721.72,3860.5 v1(2726,3860.5)
  Bottom Layer w10: v1(2726,3860.5) 2726,3869.18 2730.34,3864.84 2733.59,3861.59 2762,3890 2762,3936.08 R15.1@2798.95,3973.03
AIR+_FB: J1.B5 R50.1 | length 457.6
  Bottom Layer w10: R50.1@3113.56,3671.86 3148.7,3707 3395,3707 3414,3726 3414,3790.02 J1.B5@3463.98,3840
AIR+_FB_µC: C35.2 D22.3 R50.2 R57.2 U1.54 | length 786.8
  Top Layer w10: U1.54@2484.21,3817.83 2613.17,3817.83 2654,3777 v1(2654,3774)
  Bottom Layer w10: v1@2654,3779 v1(2654,3774) 2654,3770.11 2626.61,3742.72 2626.61,3712.47 2656.08,3683 R57.2@2880.94,3683 ; R57.2@2883.8,3681.51 2911.35,3653.95 3080.49,3653.95 R50.2@3112,3622.44
AIR-_CTRL: J1.B8 Q1.3 | length 756.7
  Bottom Layer w10: Q1.3@3043.58,3792.62 3043.58,3884.35 3091.73,3932.5 3094.5,3932.5 3096,3934 3096,4102.92 3181.09,4188.01 3415.98,4188.01 J1.B8@3463.98,4140
AIR-_CTRL_µC: R14.1 U1.56 | length 330.4
  Top Layer w10: U1.56@2484.21,3857.2 2640.8,3857.2 2667,3831 v1(2699,3831)
  Bottom Layer w10: v1(2699,3831) 2709.82,3820.18 R14.1@2799.29,3820.18
AIR-_FB: J1.B4 R55.1 | length 542.2
  Bottom Layer w10: R55.1@3112.56,3472.44 3145,3504.88 3145,3641.44 3193.56,3690 3413.98,3690 J1.B4@3463.98,3740
AIR-_FB_µC: C33.2 D20.3 R52.2 R55.2 U1.53 | length 791.8
  Top Layer w10: U1.53@2484.21,3798.15 2588.85,3798.15 v1(2616,3771)
  Bottom Layer w10: v1(2616,3771) 2609,3764 2609,3763 2609.61,3762.39 2609.61,3705.43 2767.48,3547.56 C33.2@2801.06,3547.56 ; C33.2@2798.09,3548.56 R52.2@2887,3548.56 2908,3527.56 3043.79,3527.56 R55.2@3112.56,3527.56
AMS_CLR_ERR: J1.A8 Q4.3 R20.1 | length 695.2
  Top Layer w10: Q4.3@2868,3867.29 2868,3878.12 2895.56,3905.68 R20.1@2895.56,3948 2906.31,3958.75 2906.31,3976.83 2915.56,3986.09 3286.03,3986.09 3324.48,4024.54 3324.48,4071.9 3360.49,4107.9 3360.49,4136.5 J1.A8@3363.98,4140
AMS_CLR_ERR_µC: R21.1 U1.55 | length 631.1
  Top Layer w10: U1.55@2484.21,3837.52 2634.48,3837.52 2697,3775 2697,3613.82 2731.82,3579 2851.56,3579 R21.1@2895.56,3623
AMS_OK: J1.B11 R37.1 | length 376.9
  Bottom Layer w10: R37.1@3112.59,4378.44 3122.06,4387.91 3411.9,4387.91 J1.B11@3463.98,4440
AMS_OK_µC: C27.2 D14.3 R37.2 R38.2 U1.52 | length 1189
  Top Layer w10: U1.52@2484.21,3778.46 2554.65,3778.46 v1(2582.11,3751)
  Bottom Layer w10: v1(2582.11,3751) 2588.5,3757.39 2588.5,3782.39 2604.61,3798.5 2613,3798.5 2675,3860.5 2675,3914.61 2693,3932.61 2693,3963.82 2752.76,4023.58 2752.76,4077.17 2733.5,4096.43 2733.5,4202.5 2777,4246 2821,4246 2837,4262 2837,4366.04 D14.3@2876.96,4406 2933.06,4406 2960.62,4433.56 C27.2@2962.59,4433.56 2973.34,4422.81 3024.87,4422.81 3035.62,4433.56 R37.2@3112.59,4433.56
BL1: D2.6 R5.2 | length 125.3
  Top Layer w10: D2.6@2469.37,4778.98 2469.37,4765.63 v1(2515,4720)
  Bottom Layer w10: R5.2@2515,4672.56 v1(2515,4720)
BL2: D3.6 R8.2 | length 115.6
  Top Layer w10: D3.6@2274.37,4779.02 2274.37,4775.98 2287.5,4762.85 2290.54,4762.85 2301.45,4751.95 v1(2301.45,4723.87)
  Bottom Layer w10: R8.2@2301.45,4676.43 v1(2301.45,4723.87)
BOOT0: R2.1 U1.37 | length 171.6
  Top Layer w10: U1.37@2165.32,3695.79 v1@2165.32,3768.32
  Bottom Layer w10: R2.1@2166,3669.56 2166.37,3669.93 v1(2166.37,3768.52)
BRAKE_PRESS: J1.A10 R25.2 | length 303.2
  Bottom Layer w10: R25.2@3114,4221.44 3122.75,4230.19 3151.15,4230.19 3163.81,4242.85 3273.85,4242.85 3363.98,4332.98 J1.A10@3363.98,4340
BRAKE_PRESS_µC: C20.2 D7.3 R25.1 R26.2 U1.84 | length 1082.4
  Top Layer w10: v1(2252,4392) 2258,4392 2263.74,4386.26 U1.84@2263.74,4294.21 ; v1(2455.5,4345.75) 2504.74,4345.75 2514.6,4335.89 2558.16,4335.89 2590.27,4368 2811,4368 v1(2877,4302)
  Bottom Layer w10: v1(2252,4392) 2299.21,4344.79 2454.55,4344.79 v1(2455.5,4345.75) ; v1(2877,4302) 2902.44,4276.56 2905.93,4276.56 ; D7.3@2878.37,4249 2905.93,4276.56 ; R25.1@3114,4276.56 2905.93,4276.56
BSPD_OK: J1.B13 R39.1 | length 3791.5
  Top Layer w10: v1(1501.13,3609.56) R39.1@1611.3,3609.56
  Bottom Layer w10: v1(1501.13,3609.56) 1501.13,3469.06 1848.19,3122 3089.4,3122 3351,3383.6 3457.46,3383.6 3504.5,3430.64 3504.5,3435.55 3547,3478.05 3547,4561.49 J1.B13@3463.98,4644.51
BSPD_OK_µC: C28.2 D15.3 R39.2 R40.2 U1.29 | length 509.8
  Top Layer w10: R39.2@1611.3,3554.44 1617.23,3560.37 D15.3@1734,3560.37 1736.26,3562.63 R40.2@1736.26,3622.2 1736.26,3624.17 1747.31,3635.22 C28.2@1826.38,3635.22 1974.15,3635.22 2007.76,3668.83 U1.29@2007.83,3698.74 U1.29@2007.83,3698.74
BUZR_CTRL: J1.A5 U1.70 | length 1660.9
  Top Layer w10: U1.70@2484.21,4132.8 2485.42,4134 v1(2617,4134) v1@2617,4129 ; v1(2641,3630) 2634,3630 2637.5,3626.5 2654,3610 2676.78,3610 2725.78,3561 3201,3561 3250.5,3610.5 3250.5,3740.58 3332.66,3822.75 J1.A5@3363.98,3844.51
  Bottom Layer w10: v1(2617,4134) 2554.61,4071.61 2554.61,3736.39 2641,3650 v1(2641,3630)
BUZR_FB: J2.B5 R49.1 R51.2 | length 424.2
  Top Layer w10: J2.B5@733.98,3843 783,3843 859.13,3766.87 883.24,3766.87 885.61,3764.5 908.39,3764.5 910.76,3766.87 958.13,3766.87 974,3751 974,3724 R51.2@934,3684 ; 974,3719 R49.1@1009,3684
  Bottom Layer w10: J2.B5@733.98,3831.97 J2.B5@733.98,3843
BUZR_FB_µC: C32.2 D19.3 R49.2 U1.24 | length 936.3
  Top Layer w10: R49.2@1009,3739.12 C32.2@1084,3739.12 1142.07,3739.12 D19.3@1169.63,3711.56 1179.28,3721.21 1332.15,3721.21 1356.73,3696.64 1729.83,3696.64 1811.65,3778.46 U1.24@1885.79,3778.46
CAN_D: R43.2 U2.1 | length 111.2
  Top Layer w10: U2.1@1873.78,4779.56 R43.2@1985,4779.56